# Altium PCB imprimir.PcbDoc (part 3 of 4)
Units mm, origin at the board's own origin, x right, y up, seen from the top; angles counter-clockwise.
Board outline 196.72 x 221.49 mm, 2 copper layers (Top Layer, Bottom Layer); 172 components, 0 nets, 904 pads, 232 vias.
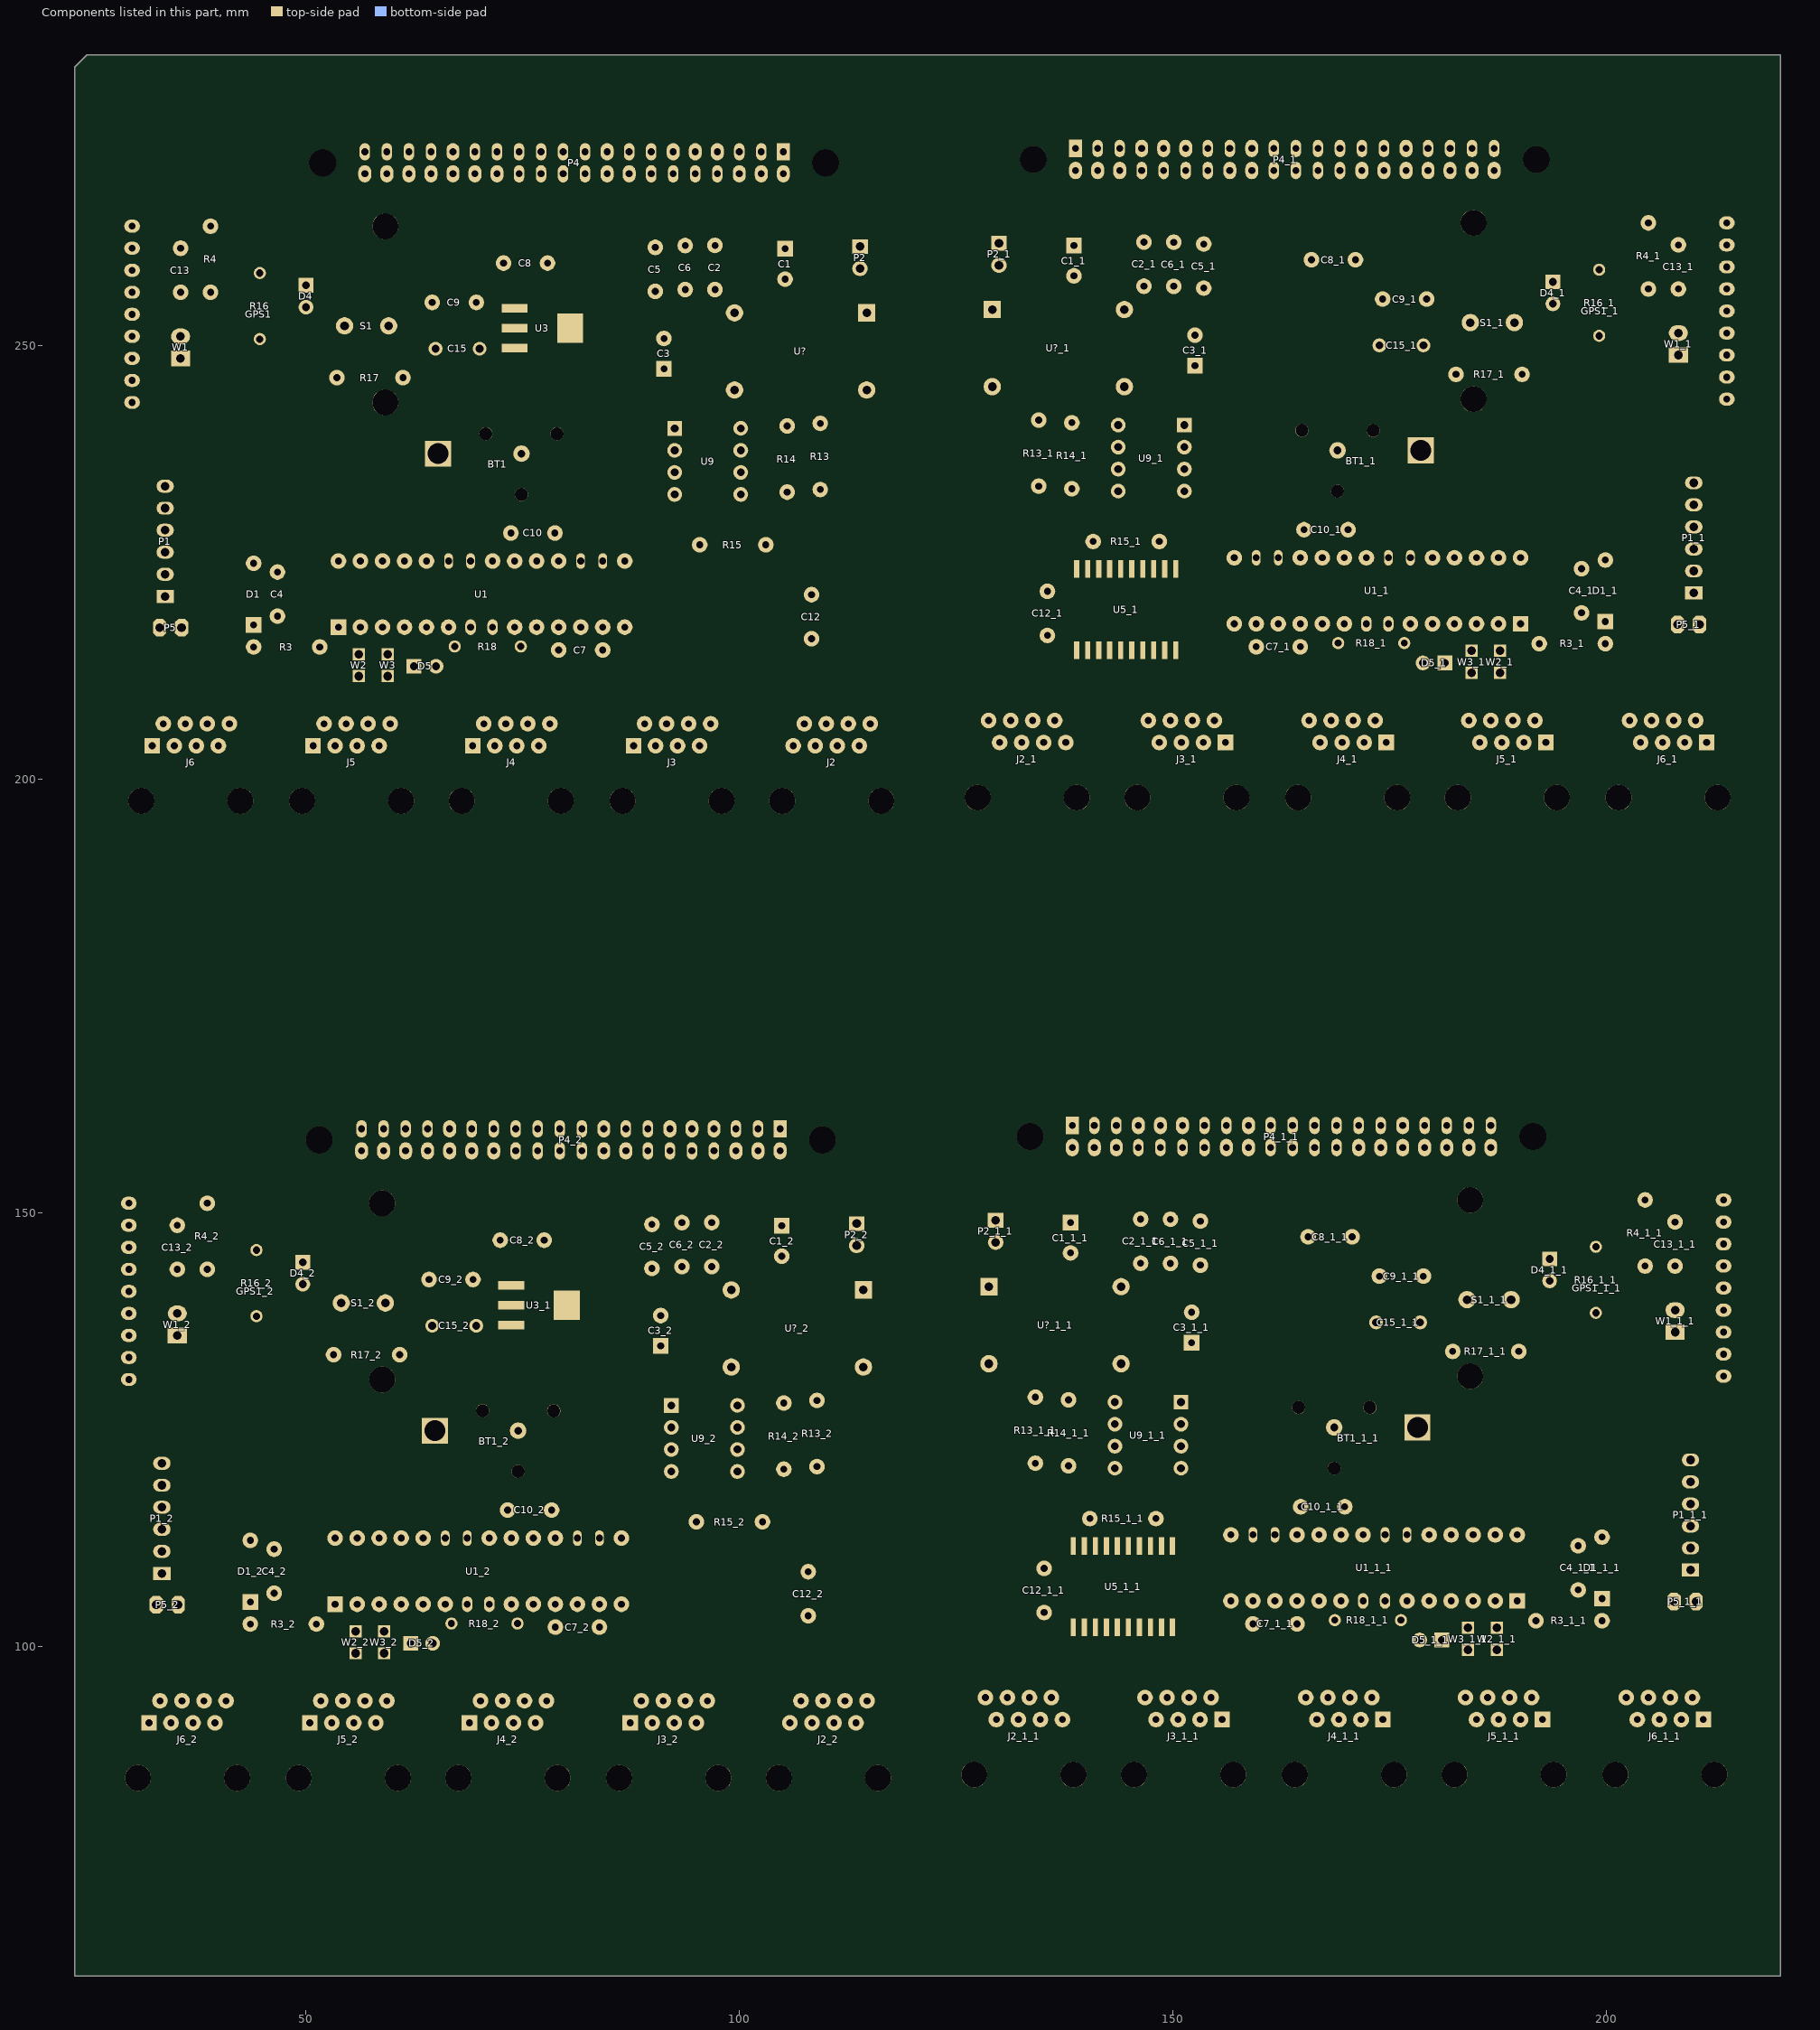
[diagram p3: the components of this part, seen from the top]

## Via types
v1: diameter 1.6, hole 0.6, Top Layer to Bottom Layer, 232 vias

## Nets (pads, with @x,y where several pads share a name; then routed paths per layer and width w, separated by ;. In a path a pad name is that pad's centre, name@x,y a point inside that pad or via, vN(x,y) a via of type N, cw(c..) or ccw(c..) an arc to the next point about the centre after c; other vN are vias at no path point) (continued)
copper on no net: (continued)
  Top Layer w0.025: 96.368,108.585 98.095,108.585 ; 96.368,108.61 96.571,108.61 ; 96.368,108.636 98.019,108.636 ; 96.368,108.661 97.993,108.661 ; 96.368,108.687 97.968,108.687 ; 96.368,108.712 97.942,108.712 ; 96.368,108.737 97.942,108.737 ; 96.368,108.763 97.917,108.763 ; 96.368,108.788 97.917,108.788 ; 96.368,108.814 97.917,108.814 ; 96.368,108.839 97.917,108.839 ; 96.368,108.864 97.917,108.864 ; 96.368,108.89 97.917,108.89 ; 96.368,108.915 97.942,108.915 ; 96.393,106.147 96.418,106.147 ; 96.393,106.172 96.418,106.172 ; 96.393,108.356 96.418,108.356 ; 96.393,108.382 96.418,108.382 ; 96.393,108.407 96.52,108.407 ; 96.393,108.941 97.942,108.941 ; 96.393,108.966 97.942,108.966 ; 96.393,108.991 97.968,108.991 ; 96.393,109.017 97.993,109.017 ; 96.393,109.042 98.019,109.042 ; 96.418,109.068 98.044,109.068 ; 96.418,109.093 98.095,109.093 ; 96.418,109.118 98.146,109.118 ; 96.418,109.144 98.222,109.144 ; 96.444,106.629 96.52,106.629 ; 96.444,106.655 97.841,106.655 ; 96.444,106.68 97.841,106.68 ; 96.444,106.705 96.672,106.705 ; 96.444,106.731 96.672,106.731 ; 96.444,109.169 98.374,109.169 ; 96.444,109.195 100.533,109.195 ; 96.444,109.22 100.533,109.22 ; 96.469,106.604 96.495,106.604 ; 96.469,109.245 100.508,109.245 ; 96.469,109.271 100.508,109.271 ; 96.495,105.969 96.52,105.969 ; 96.495,109.296 100.482,109.296 ; 96.495,109.322 100.482,109.322 ; 96.495,109.347 100.457,109.347 ; 96.52,105.943 100.559,105.943 ; 96.52,106.223 100.686,106.223 ; 96.52,106.248 100.711,106.248 ; 96.52,106.274 98.323,106.274 ; 96.52,106.299 98.222,106.299 ; 96.52,106.324 98.146,106.324 ; 96.52,106.35 98.095,106.35 ; 96.52,106.375 98.069,106.375 ; 96.52,106.401 96.698,106.401 ; 96.52,109.372 100.457,109.372 ; 96.52,109.398 100.432,109.398 ; 96.545,105.918 100.533,105.918 ; 96.545,106.147 100.66,106.147 ; 96.545,106.172 100.66,106.172 ; 96.545,106.197 100.686,106.197 ; 96.545,106.426 96.698,106.426 ; 96.545,109.423 100.432,109.423 ; 96.571,105.867 100.508,105.867 ; 96.571,105.893 100.533,105.893 ; 96.571,105.969 100.584,105.969 ; 96.571,105.994 100.584,105.994 ; 96.571,106.02 100.609,106.02 ; 96.571,106.045 100.609,106.045 ; 96.571,106.07 100.635,106.07 ; 96.571,106.096 100.635,106.096 ; 96.571,106.121 100.635,106.121 ; 96.571,106.451 96.698,106.451 ; 96.571,106.477 96.698,106.477 ; 96.571,106.502 96.698,106.502 ; 96.571,106.528 96.698,106.528 ; 96.571,106.553 96.698,106.553 ; 96.571,106.578 97.892,106.578 ; 96.571,106.604 97.866,106.604 ; 96.571,106.629 97.866,106.629 ; 96.571,108.306 99.111,108.306 ; 96.571,108.331 98.984,108.331 ; 96.571,108.356 96.825,108.356 ; 96.571,108.382 96.825,108.382 ; 96.571,109.449 100.406,109.449 ; 96.571,109.474 100.406,109.474 ; 96.596,105.816 100.482,105.816 ; 96.596,105.842 100.482,105.842 ; 96.596,108.255 96.952,108.255 ; 96.596,108.28 96.952,108.28 ; 96.596,108.407 96.825,108.407 ; 96.596,108.433 96.825,108.433 ; 96.596,108.458 96.825,108.458 ; 96.596,108.61 98.044,108.61 ; 96.596,109.499 100.381,109.499 ; 96.596,109.525 100.355,109.525 ; 96.622,105.791 100.457,105.791 ; 96.622,108.052 96.825,108.052 ; 96.622,108.077 96.825,108.077 ; 96.622,108.204 96.926,108.204 ; 96.622,108.229 96.926,108.229 ; 96.622,109.55 100.33,109.55 ; 96.647,105.766 100.432,105.766 ; 96.647,107.848 96.749,107.848 ; 96.647,107.874 96.774,107.874 ; 96.647,107.899 96.799,107.899 ; 96.647,107.925 96.825,107.925 ; 96.647,107.95 96.952,107.95 ; 96.647,107.975 96.952,107.975 ; 96.647,108.001 96.952,108.001 ; 96.647,108.026 96.952,108.026 ; 96.647,108.102 96.825,108.102 ; 96.647,108.128 96.825,108.128 ; 96.647,108.153 96.825,108.153 ; 96.647,108.179 96.876,108.179 ; 96.647,109.576 100.33,109.576 ; 96.647,109.601 100.305,109.601 ; 96.672,105.74 100.406,105.74 ; 96.672,107.798 96.723,107.798 ; 96.672,107.823 96.723,107.823 ; 96.672,109.626 100.305,109.626 ; 96.672,219.1 96.774,219.1 ; 96.672,219.126 96.749,219.126 ; 96.672,219.151 96.749,219.151 ; 96.672,219.177 96.749,219.177 ; 96.698,105.715 100.381,105.715 ; 96.698,109.652 100.279,109.652 ; 96.698,219.024 96.774,219.024 ; 96.698,219.05 96.774,219.05 ; 96.698,219.075 96.774,219.075 ; 96.723,105.689 100.381,105.689 ; 96.723,106.401 98.019,106.401 ; 96.723,106.426 97.993,106.426 ; 96.723,106.528 97.917,106.528 ; 96.723,106.553 97.892,106.553 ; 96.723,109.677 100.254,109.677 ; 96.723,218.948 96.774,218.948 ; 96.723,218.973 96.774,218.973 ; 96.723,218.999 96.774,218.999 ; 96.749,105.664 100.355,105.664 ; 96.749,106.451 97.968,106.451 ; 96.749,106.477 97.942,106.477 ; 96.749,106.502 97.942,106.502 ; 96.749,106.705 97.841,106.705 ; 96.749,109.703 100.228,109.703 ; 96.749,109.728 100.203,109.728 ; 96.749,218.846 96.799,218.846 ; 96.749,218.872 96.799,218.872 ; 96.749,218.897 96.799,218.897 ; 96.749,218.923 96.774,218.923 ; 96.749,221.082 96.952,221.082 ; 96.749,221.107 96.952,221.107 ; 96.749,221.132 97.206,221.132 ; 96.749,221.158 97.206,221.158 ; 96.749,221.183 98.603,221.183 ; 96.749,221.209 98.552,221.209 ; 96.749,221.234 98.476,221.234 ; 96.749,221.259 96.952,221.259 ; 96.749,221.285 98.4,221.285 ; 96.749,221.31 98.374,221.31 ; 96.749,221.336 98.349,221.336 ; 96.749,221.361 98.323,221.361 ; 96.749,221.386 98.323,221.386 ; 96.749,221.412 98.298,221.412 ; 96.749,221.437 98.298,221.437 ; 96.749,221.463 98.298,221.463 ; 96.749,221.488 98.298,221.488 ; 96.749,221.513 98.298,221.513 ; 96.749,221.539 98.298,221.539 ; 96.749,221.564 98.323,221.564 ; 96.774,105.639 100.305,105.639 ; 96.774,109.753 100.178,109.753 ; 96.774,218.796 96.799,218.796 ; 96.774,218.821 96.799,218.821 ; 96.774,221.005 96.799,221.005 ; 96.774,221.031 96.799,221.031 ; 96.774,221.056 96.901,221.056 ; 96.774,221.59 98.323,221.59 ; 96.774,221.615 98.323,221.615 ; 96.774,221.64 98.349,221.64 ; 96.774,221.666 98.374,221.666 ; 96.774,221.691 98.4,221.691 ; 96.799,105.613 100.305,105.613 ; 96.799,221.717 98.425,221.717 ; 96.799,221.742 98.476,221.742 ; 96.799,221.767 98.527,221.767 ; 96.799,221.793 98.603,221.793 ; 96.825,105.588 100.279,105.588 ; 96.825,109.779 100.152,109.779 ; 96.825,109.804 100.127,109.804 ; 96.825,219.278 96.901,219.278 ; 96.825,219.304 98.222,219.304 ; 96.825,219.329 98.222,219.329 ; 96.825,219.354 97.053,219.354 ; 96.825,219.38 97.053,219.38 ; 96.825,221.818 98.755,221.818 ; 96.825,221.844 100.914,221.844 ; 96.825,221.869 100.914,221.869 ; 96.85,105.562 100.254,105.562 ; 96.85,108.052 96.952,108.052 ; 96.85,108.356 98.882,108.356 ; 96.85,108.382 97.714,108.382 ; 96.85,108.407 97.714,108.407 ; 96.85,108.433 97.714,108.433 ; 96.85,108.458 97.688,108.458 ; 96.85,108.483 97.688,108.483 ; 96.85,108.509 97.714,108.509 ; 96.85,219.253 96.876,219.253 ; 96.85,221.894 100.889,221.894 ; 96.85,221.92 100.889,221.92 ; 96.876,108.077 96.926,108.077 ; 96.876,109.83 100.101,109.83 ; 96.876,218.618 96.901,218.618 ; 96.876,221.945 100.863,221.945 ; 96.876,221.971 100.863,221.971 ; 96.876,221.996 100.838,221.996 ; 96.901,105.537 100.203,105.537 ; 96.901,109.855 100.076,109.855 ; 96.901,218.592 100.94,218.592 ; 96.901,218.872 101.067,218.872 ; 96.901,218.897 101.092,218.897 ; 96.901,218.923 98.704,218.923 ; 96.901,218.948 98.603,218.948 ; 96.901,218.973 98.527,218.973 ; 96.901,218.999 98.476,218.999 ; 96.901,219.024 98.45,219.024 ; 96.901,219.05 97.079,219.05 ; 96.901,222.021 100.838,222.021 ; 96.901,222.047 100.813,222.047 ; 96.926,105.512 100.178,105.512 ; 96.926,109.88 100.051,109.88 ; 96.926,218.567 100.914,218.567 ; 96.926,218.796 101.041,218.796 ; 96.926,218.821 101.041,218.821 ; 96.926,218.846 101.067,218.846 ; 96.926,219.075 97.079,219.075 ; 96.926,222.072 100.813,222.072 ; 96.952,106.731 97.841,106.731 ; 96.952,109.906 100,109.906 ; 96.952,218.516 100.889,218.516 ; 96.952,218.542 100.914,218.542 ; 96.952,218.618 100.965,218.618 ; 96.952,218.643 100.965,218.643 ; 96.952,218.669 100.99,218.669 ; 96.952,218.694 100.99,218.694 ; 96.952,218.719 101.016,218.719 ; 96.952,218.745 101.016,218.745 ; 96.952,218.77 101.016,218.77 ; 96.952,219.1 97.079,219.1 ; 96.952,219.126 97.079,219.126 ; 96.952,219.151 97.079,219.151 ; 96.952,219.177 97.079,219.177 ; 96.952,219.202 97.079,219.202 ; 96.952,219.227 98.273,219.227 ; 96.952,219.253 98.247,219.253 ; 96.952,219.278 98.247,219.278 ; 96.952,220.955 99.492,220.955 ; 96.952,220.98 99.365,220.98 ; 96.952,221.005 97.206,221.005 ; 96.952,221.031 97.206,221.031 ; 96.952,222.098 100.787,222.098 ; 96.952,222.123 100.787,222.123 ; 96.977,105.486 100.152,105.486 ; 96.977,108.204 97.714,108.204 ; 96.977,108.229 99.39,108.229 ; 96.977,108.255 99.289,108.255 ; 96.977,108.28 99.187,108.28 ; 96.977,218.465 100.863,218.465 ; 96.977,218.491 100.863,218.491 ; 96.977,220.904 97.333,220.904 ; 96.977,220.929 97.333,220.929 ; 96.977,221.056 97.206,221.056 ; 96.977,221.082 97.206,221.082 ; 96.977,221.107 97.206,221.107 ; 96.977,221.259 98.425,221.259 ; 96.977,222.148 100.762,222.148 ; 96.977,222.174 100.736,222.174 ; 97.003,105.461 100.101,105.461 ; 97.003,108.128 97.714,108.128 ; 97.003,108.153 97.714,108.153 ; 97.003,108.179 97.714,108.179 ; 97.003,109.931 99.974,109.931 ; 97.003,218.44 100.838,218.44 ; 97.003,220.701 97.206,220.701 ; 97.003,220.726 97.206,220.726 ; 97.003,220.853 97.307,220.853 ; 97.003,220.878 97.307,220.878 ; 97.003,222.199 100.711,222.199 ; 97.028,108.052 97.688,108.052 ; 97.028,108.077 97.688,108.077 ; 97.028,108.102 97.714,108.102 ; 97.028,109.957 99.949,109.957 ; 97.028,218.415 100.813,218.415 ; 97.028,220.497 97.13,220.497 ; 97.028,220.523 97.155,220.523 ; 97.028,220.548 97.18,220.548 ; 97.028,220.574 97.206,220.574 ; 97.028,220.599 97.333,220.599 ; 97.028,220.624 97.333,220.624 ; 97.028,220.65 97.333,220.65 ; 97.028,220.675 97.333,220.675 ; 97.028,220.751 97.206,220.751 ; 97.028,220.777 97.206,220.777 ; 97.028,220.802 97.206,220.802 ; 97.028,220.828 97.257,220.828 ; 97.028,222.225 100.711,222.225 ; 97.028,222.25 100.686,222.25 ; 97.053,105.435 100.076,105.435 ; 97.053,108.026 97.714,108.026 ; 97.053,218.389 100.787,218.389 ; 97.053,220.447 97.104,220.447 ; 97.053,220.472 97.104,220.472 ; 97.053,222.275 100.686,222.275 ; 97.079,105.41 100.025,105.41 ; 97.079,108.001 97.663,108.001 ; 97.079,109.982 99.898,109.982 ; 97.079,218.364 100.762,218.364 ; 97.079,222.301 100.66,222.301 ; 97.104,107.975 97.155,107.975 ; 97.104,110.007 99.873,110.007 ; 97.104,218.338 100.762,218.338 ; 97.104,219.05 98.4,219.05 ; 97.104,219.075 98.374,219.075 ; 97.104,219.177 98.298,219.177 ; 97.104,219.202 98.273,219.202 ; 97.104,222.326 100.635,222.326 ; 97.13,105.385 99.974,105.385 ; 97.13,218.313 100.736,218.313 ; 97.13,219.1 98.349,219.1 ; 97.13,219.126 98.323,219.126 ; 97.13,219.151 98.323,219.151 ; 97.13,219.354 98.222,219.354 ; 97.13,222.352 100.609,222.352 ; 97.13,222.377 100.584,222.377 ; 97.155,218.288 100.686,218.288 ; 97.155,222.402 100.559,222.402 ; 97.18,105.359 99.924,105.359 ; 97.18,107.975 97.257,107.975 ; 97.18,110.033 99.822,110.033 ; 97.18,218.262 100.686,218.262 ; 97.206,107.95 97.231,107.95 ; 97.206,110.058 99.771,110.058 ; 97.206,218.237 100.66,218.237 ; 97.206,222.428 100.533,222.428 ; 97.206,222.453 100.508,222.453 ; 97.231,105.334 99.873,105.334 ; 97.231,218.211 100.635,218.211 ; 97.231,220.701 97.333,220.701 ; 97.231,221.005 99.263,221.005 ; 97.231,221.031 98.095,221.031 ; 97.231,221.056 98.095,221.056 ; 97.231,221.082 98.095,221.082 ; 97.231,221.107 98.069,221.107 ; 97.231,221.132 98.069,221.132 ; 97.231,221.158 98.095,221.158 ; 97.257,220.726 97.307,220.726 ; 97.257,222.479 100.482,222.479 ; 97.282,105.308 99.822,105.308 ; 97.282,110.084 99.72,110.084 ; 97.282,218.186 100.584,218.186 ; 97.282,222.504 100.457,222.504 ; 97.307,107.95 97.638,107.95 ; 97.307,107.975 97.638,107.975 ; 97.307,218.161 100.559,218.161 ; 97.307,222.529 100.432,222.529 ; 97.333,105.283 99.771,105.283 ; 97.333,107.798 97.485,107.798 ; 97.333,107.823 97.638,107.823 ; 97.333,107.899 97.638,107.899 ; 97.333,107.925 97.638,107.925 ; 97.333,110.109 99.644,110.109 ; 97.333,219.38 98.222,219.38 ; 97.333,222.555 100.381,222.555 ; 97.358,107.848 97.638,107.848 ; 97.358,107.874 97.638,107.874 ; 97.358,218.135 100.533,218.135 ; 97.358,220.853 98.095,220.853 ; 97.358,220.878 99.771,220.878 ; 97.358,220.904 99.67,220.904 ; 97.358,220.929 99.568,220.929 ; 97.384,110.134 99.568,110.134 ; 97.384,218.11 100.482,218.11 ; 97.384,220.777 98.095,220.777 ; 97.384,220.802 98.095,220.802 ; 97.384,220.828 98.095,220.828 ; 97.384,222.58 100.355,222.58 ; 97.409,105.258 99.695,105.258 ; 97.409,220.701 98.069,220.701 ; 97.409,220.726 98.069,220.726 ; 97.409,220.751 98.095,220.751 ; 97.409,222.606 100.33,222.606 ; 97.434,218.084 100.457,218.084 ; 97.434,220.675 98.095,220.675 ; 97.46,110.16 99.517,110.16 ; 97.46,218.059 100.406,218.059 ; 97.46,220.65 98.044,220.65 ; 97.46,222.631 100.279,222.631 ; 97.485,105.232 99.644,105.232 ; 97.485,220.624 97.536,220.624 ; 97.485,222.656 100.254,222.656 ; 97.511,107.798 97.663,107.798 ; 97.511,218.034 100.355,218.034 ; 97.536,107.721 97.663,107.721 ; 97.536,107.747 97.663,107.747 ; 97.536,107.772 97.663,107.772 ; 97.536,110.185 99.416,110.185 ; 97.561,105.207 99.543,105.207 ; 97.561,107.671 97.638,107.671 ; 97.561,107.696 97.663,107.696 ; 97.561,218.008 100.305,218.008 ; 97.561,220.624 97.638,220.624 ; 97.561,222.682 100.203,222.682 ; 97.587,220.599 97.612,220.599 ; 97.587,222.707 100.152,222.707 ; 97.612,110.211 99.339,110.211 ; 97.612,217.983 100.254,217.983 ; 97.638,105.181 99.466,105.181 ; 97.663,217.957 100.203,217.957 ; 97.663,222.733 100.101,222.733 ; 97.688,220.599 98.019,220.599 ; 97.688,220.624 98.019,220.624 ; 97.714,217.932 100.152,217.932 ; 97.714,220.447 97.866,220.447 ; 97.714,220.472 98.019,220.472 ; 97.714,220.548 98.019,220.548 ; 97.714,220.574 98.019,220.574 ; 97.714,222.758 100.025,222.758 ; 97.739,108.026 97.968,108.026 ; 97.739,108.052 99.873,108.052 ; 97.739,108.077 99.822,108.077 ; 97.739,108.102 99.771,108.102 ; 97.739,108.128 99.72,108.128 ; 97.739,108.153 99.619,108.153 ; 97.739,108.179 99.568,108.179 ; 97.739,108.204 99.466,108.204 ; 97.739,108.382 98.781,108.382 ; 97.739,108.407 98.679,108.407 ; 97.739,108.509 98.298,108.509 ; 97.739,110.236 99.212,110.236 ; 97.739,220.497 98.019,220.497 ; 97.739,220.523 98.019,220.523 ; 97.765,105.156 99.365,105.156 ; 97.765,107.874 97.866,107.874 ; 97.765,107.899 97.892,107.899 ; 97.765,107.925 97.892,107.925 ; 97.765,107.95 97.942,107.95 ; 97.765,107.975 97.942,107.975 ; 97.765,108.001 97.968,108.001 ; 97.765,108.433 98.577,108.433 ; 97.765,108.458 98.476,108.458 ; 97.765,108.483 98.374,108.483 ; 97.765,222.783 99.949,222.783 ; 97.79,107.798 97.841,107.798 ; 97.79,107.823 97.866,107.823 ; 97.79,107.848 97.866,107.848 ; 97.79,217.907 100.076,217.907 ; 97.841,105.131 99.263,105.131 ; 97.841,222.809 99.898,222.809 ; 97.866,217.881 100.025,217.881 ; 97.892,220.447 98.044,220.447 ; 97.917,220.37 98.044,220.37 ; 97.917,220.396 98.044,220.396 ; 97.917,220.421 98.044,220.421 ; 97.917,222.834 99.797,222.834 ; 97.942,217.856 99.924,217.856 ; 97.942,220.32 98.019,220.32 ; 97.942,220.345 98.044,220.345 ; 97.968,107.188 98.095,107.188 ; 97.968,107.213 98.095,107.213 ; 97.993,107.239 98.069,107.239 ; 97.993,108.001 98.425,108.001 ; 97.993,108.026 99.924,108.026 ; 97.993,222.86 99.72,222.86 ; 98.019,107.163 98.273,107.163 ; 98.019,107.264 98.069,107.264 ; 98.019,107.975 98.4,107.975 ; 98.019,217.83 99.847,217.83 ; 98.044,107.925 100.127,107.925 ; 98.044,107.95 98.4,107.95 ; 98.069,107.798 98.323,107.798 ; 98.069,107.823 98.349,107.823 ; 98.069,107.848 98.374,107.848 ; 98.069,107.874 98.374,107.874 ; 98.069,107.899 100.152,107.899 ; 98.095,107.671 98.196,107.671 ; 98.095,107.696 98.196,107.696 ; 98.095,107.721 98.222,107.721 ; 98.095,107.747 98.222,107.747 ; 98.095,107.772 98.298,107.772 ; 98.12,107.137 98.273,107.137 ; 98.12,107.62 98.171,107.62 ; 98.12,107.645 98.171,107.645 ; 98.12,220.675 98.349,220.675 ; 98.12,220.701 100.254,220.701 ; 98.12,220.726 100.203,220.726 ; 98.12,220.751 100.152,220.751 ; 98.12,220.777 100.101,220.777 ; 98.12,220.802 100,220.802 ; 98.12,220.828 99.949,220.828 ; 98.12,220.853 99.847,220.853 ; 98.12,221.031 99.162,221.031 ; 98.12,221.056 99.06,221.056 ; 98.12,221.158 98.679,221.158 ; 98.12,222.885 99.593,222.885 ; 98.146,107.188 98.273,107.188 ; 98.146,107.213 98.273,107.213 ; 98.146,217.805 99.746,217.805 ; 98.146,220.523 98.247,220.523 ; 98.146,220.548 98.273,220.548 ; 98.146,220.574 98.273,220.574 ; 98.146,220.599 98.323,220.599 ; 98.146,220.624 98.323,220.624 ; 98.146,220.65 98.349,220.65 ; 98.146,221.082 98.958,221.082 ; 98.146,221.107 98.857,221.107 ; 98.146,221.132 98.755,221.132 ; 98.171,107.239 98.273,107.239 ; 98.171,220.447 98.222,220.447 ; 98.171,220.472 98.247,220.472 ; 98.171,220.497 98.247,220.497 ; 98.196,107.264 98.247,107.264 ; 98.222,107.112 98.273,107.112 ; 98.222,217.78 99.644,217.78 ; 98.247,107.747 98.273,107.747 ; 98.349,110.134 99.619,110.134 ; 98.349,219.837 98.476,219.837 ; 98.349,219.862 98.476,219.862 ; 98.374,107.798 98.755,107.798 ; 98.374,219.888 98.45,219.888 ; 98.374,220.65 98.806,220.65 ; 98.374,220.675 100.305,220.675 ; 98.4,107.061 100.762,107.061 ; 98.4,107.086 98.755,107.086 ; 98.4,107.772 98.679,107.772 ; 98.4,107.823 98.781,107.823 ; 98.4,107.848 99.289,107.848 ; 98.4,107.874 99.289,107.874 ; 98.4,219.812 98.654,219.812 ; 98.4,219.913 98.45,219.913 ; 98.4,220.624 98.781,220.624 ; 98.425,107.112 98.755,107.112 ; 98.425,107.747 98.501,107.747 ; 98.425,107.95 100.076,107.95 ; 98.425,220.574 100.508,220.574 ; 98.425,220.599 98.781,220.599 ; 98.45,107.137 98.603,107.137 ; 98.45,107.721 98.476,107.721 ; 98.45,107.975 100.025,107.975 ; 98.45,108.001 99.974,108.001 ; 98.45,220.447 98.704,220.447 ; 98.45,220.472 98.73,220.472 ; 98.45,220.497 98.755,220.497 ; 98.45,220.523 98.755,220.523 ; 98.45,220.548 100.533,220.548 ; 98.476,107.163 98.603,107.163 ; 98.476,107.188 98.603,107.188 ; 98.476,107.213 98.603,107.213 ; 98.476,220.32 98.577,220.32 ; 98.476,220.345 98.577,220.345 ; 98.476,220.37 98.603,220.37 ; 98.476,220.396 98.603,220.396 ; 98.476,220.421 98.679,220.421 ; 98.501,107.239 98.603,107.239 ; 98.501,219.786 98.654,219.786 ; 98.501,220.269 98.552,220.269 ; 98.501,220.294 98.552,220.294 ; 98.527,107.036 100.762,107.036 ; 98.527,107.264 98.577,107.264 ; 98.527,107.747 98.679,107.747 ; 98.527,219.837 98.654,219.837 ; 98.527,219.862 98.654,219.862 ; 98.552,107.544 98.654,107.544 ; 98.552,107.569 98.654,107.569 ; 98.552,107.594 98.654,107.594 ; 98.552,107.62 98.654,107.62 ; 98.552,107.645 98.679,107.645 ; 98.552,107.671 98.654,107.671 ; 98.552,107.696 98.654,107.696 ; 98.552,107.721 98.654,107.721 ; 98.552,109.169 100.533,109.169 ; 98.552,110.16 99.39,110.16 ; 98.552,219.888 98.654,219.888 ; 98.577,107.518 98.654,107.518 ; 98.577,219.913 98.628,219.913 ; 98.603,219.761 98.654,219.761 ; 98.628,107.01 100.762,107.01 ; 98.628,107.137 98.755,107.137 ; 98.628,107.163 98.831,107.163 ; 98.628,107.188 98.857,107.188 ; 98.628,220.396 98.654,220.396 ; 98.654,107.213 98.882,107.213 ; 98.654,107.239 98.755,107.239 ; 98.679,107.264 98.73,107.264 ; 98.704,109.144 100.559,109.144 ; 98.73,106.985 100.762,106.985 ; 98.73,222.783 100,222.783 ; 98.755,110.185 99.162,110.185 ; 98.755,220.447 99.136,220.447 ; 98.781,107.086 99.238,107.086 ; 98.781,107.239 99.009,107.239 ; 98.781,219.71 101.143,219.71 ; 98.781,219.735 99.136,219.735 ; 98.781,220.421 99.06,220.421 ; 98.781,220.472 99.162,220.472 ; 98.781,220.497 99.67,220.497 ; 98.781,220.523 99.67,220.523 ; 98.806,106.959 100.762,106.959 ; 98.806,107.264 98.984,107.264 ; 98.806,109.118 100.559,109.118 ; 98.806,219.761 99.136,219.761 ; 98.806,220.396 98.882,220.396 ; 98.806,220.599 100.457,220.599 ; 98.831,107.112 99.238,107.112 ; 98.831,107.29 98.984,107.29 ; 98.831,107.823 99.289,107.823 ; 98.831,109.093 100.559,109.093 ; 98.831,219.786 98.984,219.786 ; 98.831,220.37 98.857,220.37 ; 98.831,220.624 100.406,220.624 ; 98.831,220.65 100.355,220.65 ; 98.857,107.137 99.238,107.137 ; 98.857,107.163 99.06,107.163 ; 98.857,107.798 99.289,107.798 ; 98.857,219.812 98.984,219.812 ; 98.857,219.837 98.984,219.837 ; 98.857,219.862 98.984,219.862 ; 98.882,106.274 100.711,106.274 ; 98.882,107.188 98.908,107.188 ; 98.882,107.315 98.984,107.315 ; 98.882,107.772 99.289,107.772 ; 98.882,109.068 100.584,109.068 ; 98.882,219.888 98.984,219.888 ; 98.908,106.934 100.762,106.934 ; 98.908,107.213 98.984,107.213 ; 98.908,107.34 98.958,107.34 ; 98.908,107.747 98.984,107.747 ; 98.908,109.042 100.584,109.042 ; 98.908,219.685 101.143,219.685 ; 98.908,219.913 98.958,219.913 ; 98.908,220.396 99.06,220.396 ; 98.933,107.188 99.009,107.188 ; 98.933,107.721 98.958,107.721 ; 98.933,220.193 99.035,220.193 ; 98.933,220.218 99.035,220.218 ; 98.933,220.243 99.035,220.243 ; 98.933,220.269 99.035,220.269 ; 98.933,220.294 99.06,220.294 ; 98.933,220.32 99.035,220.32 ; 98.933,220.345 99.035,220.345 ; 98.933,220.37 99.035,220.37 ; 98.933,221.818 100.914,221.818 ; 98.933,222.809 99.771,222.809 ; 98.958,106.299 100.711,106.299 ; 98.958,106.909 100.762,106.909 ; 98.958,108.991 100.584,108.991 ; 98.958,109.017 100.584,109.017 ; 98.958,220.167 99.035,220.167 ; 98.984,108.966 100.609,108.966 ; 99.009,106.883 100.787,106.883 ; 99.009,107.696 99.314,107.696 ; 99.009,107.721 99.314,107.721 ; 99.009,108.941 100.609,108.941 ; 99.009,219.659 101.143,219.659 ; 99.009,219.786 99.136,219.786 ; 99.009,219.812 99.212,219.812 ; 99.009,219.837 99.238,219.837 ; 99.035,106.324 100.711,106.324 ; 99.035,107.671 99.314,107.671 ; 99.035,107.747 99.314,107.747 ; 99.035,108.89 100.609,108.89 ; 99.035,108.915 100.609,108.915 ; 99.035,219.862 99.263,219.862 ; 99.035,219.888 99.136,219.888 ; 99.06,106.35 100.736,106.35 ; 99.06,106.858 100.787,106.858 ; 99.06,107.645 99.136,107.645 ; 99.06,108.814 100.635,108.814 ; 99.06,108.839 100.635,108.839 ; 99.06,108.864 100.635,108.864 ; 99.06,219.913 99.111,219.913 ; 99.085,106.832 100.787,106.832 ; 99.085,108.763 100.635,108.763 ; 99.085,108.788 100.635,108.788 ; 99.085,221.793 100.94,221.793 ; 99.111,106.375 100.736,106.375 ; 99.111,106.807 100.787,106.807 ; 99.111,107.163 99.212,107.163 ; 99.111,107.213 99.212,107.213 ; 99.111,107.239 99.212,107.239 ; 99.111,108.737 100.635,108.737 ; 99.111,219.634 101.143,219.634 ; 99.136,106.401 100.736,106.401 ; 99.136,106.426 100.736,106.426 ; 99.136,106.756 100.787,106.756 ; 99.136,106.782 100.787,106.782 ; 99.136,107.188 99.212,107.188 ; 99.136,107.264 99.187,107.264 ; 99.136,222.834 99.543,222.834 ; 99.162,106.451 100.762,106.451 ; 99.162,106.731 100.787,106.731 ; 99.162,219.735 99.619,219.735 ; 99.162,219.888 99.39,219.888 ; 99.187,106.477 100.762,106.477 ; 99.187,106.502 100.762,106.502 ; 99.187,106.528 100.762,106.528 ; 99.187,106.553 100.762,106.553 ; 99.187,106.578 100.762,106.578 ; 99.187,106.604 100.762,106.604 ; 99.187,106.629 100.762,106.629 ; 99.187,106.655 100.787,106.655 ; 99.187,106.68 100.787,106.68 ; 99.187,106.705 100.787,106.705 ; 99.187,219.608 101.143,219.608 ; 99.187,219.913 99.365,219.913 ; 99.187,221.767 100.94,221.767 ; 99.212,219.761 99.619,219.761 ; 99.212,219.939 99.365,219.939 ; 99.212,220.472 99.67,220.472 ; 99.212,221.742 100.94,221.742 ; 99.238,107.645 99.289,107.645 ; 99.238,219.786 99.619,219.786 ; 99.238,219.812 99.441,219.812 ; 99.238,220.447 99.67,220.447 ; 99.263,107.086 100.736,107.086 ; 99.263,107.112 100.736,107.112 ; 99.263,107.137 99.924,107.137 ; 99.263,107.163 99.517,107.163 ; 99.263,107.188 99.517,107.188 ; 99.263,107.213 99.339,107.213 ; 99.263,107.239 99.339,107.239 ; 99.263,218.923 101.092,218.923 ; 99.263,219.837 99.289,219.837 ; 99.263,219.964 99.365,219.964 ; 99.263,220.421 99.67,220.421 ; 99.263,221.717 100.965,221.717 ; 99.289,107.264 99.339,107.264 ; 99.289,219.583 101.143,219.583 ; 99.289,219.862 99.365,219.862 ; 99.289,219.989 99.339,219.989 ; 99.289,220.396 99.365,220.396 ; 99.289,221.691 100.965,221.691 ; 99.314,219.837 99.39,219.837 ; 99.314,220.37 99.339,220.37 ; 99.339,107.798 100.305,107.798 ; 99.339,107.823 100.279,107.823 ; 99.339,107.848 100.228,107.848 ; 99.339,107.874 100.203,107.874 ; 99.339,218.948 101.092,218.948 ; 99.339,219.558 101.143,219.558 ; 99.339,221.64 100.965,221.64 ; 99.339,221.666 100.965,221.666 ; 99.365,107.239 99.492,107.239 ; 99.365,107.264 99.466,107.264 ; 99.365,107.29 99.466,107.29 ; 99.365,221.615 100.99,221.615 ; 99.39,107.213 99.492,107.213 ; 99.39,107.315 99.441,107.315 ; 99.39,107.772 100.33,107.772 ; 99.39,219.532 101.168,219.532 ; 99.39,220.345 99.695,220.345 ; 99.39,220.37 99.695,220.37 ; 99.39,221.59 100.99,221.59 ; 99.416,107.747 100.127,107.747 ; 99.416,218.973 101.092,218.973 ; 99.416,220.32 99.695,220.32 ; 99.416,220.396 99.695,220.396 ; 99.416,221.539 100.99,221.539 ; 99.416,221.564 100.99,221.564 ; 99.441,107.671 99.822,107.671 ; 99.441,107.696 99.847,107.696 ; 99.441,107.721 99.873,107.721 ; 99.441,218.999 101.117,218.999 ; 99.441,219.507 101.168,219.507 ; 99.441,220.294 99.517,220.294 ; 99.441,221.463 101.016,221.463 ; 99.441,221.488 101.016,221.488 ; 99.441,221.513 101.016,221.513 ; 99.466,107.645 99.619,107.645 ; 99.466,219.481 101.168,219.481 ; 99.466,221.412 101.016,221.412 ; 99.466,221.437 101.016,221.437 ; 99.492,219.024 101.117,219.024 ; 99.492,219.456 101.168,219.456 ; 99.492,219.812 99.593,219.812 ; 99.492,219.862 99.593,219.862 ; 99.492,219.888 99.593,219.888 ; 99.492,221.386 101.016,221.386 ; 99.517,107.62 99.593,107.62 ; 99.517,219.05 101.117,219.05 ; 99.517,219.075 101.117,219.075 ; 99.517,219.405 101.168,219.405 ; 99.517,219.431 101.168,219.431 ; 99.517,219.837 99.593,219.837 ; 99.517,219.913 99.568,219.913 ; 99.543,219.1 101.143,219.1 ; 99.543,219.38 101.168,219.38 ; 99.568,107.163 99.924,107.163 ; 99.568,107.188 99.72,107.188 ; 99.568,107.213 99.695,107.213 ; 99.568,107.239 99.67,107.239 ; 99.568,107.264 99.644,107.264 ; 99.568,219.126 101.143,219.126 ; 99.568,219.151 101.143,219.151 ; 99.568,219.177 101.143,219.177 ; 99.568,219.202 101.143,219.202 ; 99.568,219.227 101.143,219.227 ; 99.568,219.253 101.143,219.253 ; 99.568,219.278 101.143,219.278 ; 99.568,219.304 101.168,219.304 ; 99.568,219.329 101.168,219.329 ; 99.568,219.354 101.168,219.354 ; 99.619,220.294 99.67,220.294 ; 99.644,107.645 99.72,107.645 ; 99.644,219.735 101.117,219.735 ; 99.644,219.761 101.117,219.761 ; 99.644,219.786 100.305,219.786 ; 99.644,219.812 99.898,219.812 ; 99.644,219.837 99.898,219.837 ; 99.644,219.862 99.72,219.862 ; 99.644,219.888 99.72,219.888 ; 99.67,107.62 99.72,107.62 ; 99.67,219.913 99.72,219.913 ; 99.72,220.447 100.686,220.447 ; 99.72,220.472 100.66,220.472 ; 99.72,220.497 100.609,220.497 ; 99.72,220.523 100.584,220.523 ; 99.746,107.188 99.949,107.188 ; 99.746,219.888 99.873,219.888 ; 99.746,219.913 99.847,219.913 ; 99.746,219.939 99.847,219.939 ; 99.771,107.213 99.924,107.213 ; 99.771,219.862 99.873,219.862 ; 99.771,219.964 99.822,219.964 ; 99.771,220.421 100.711,220.421 ; 99.797,220.396 100.508,220.396 ; 99.822,220.32 100.203,220.32 ; 99.822,220.345 100.228,220.345 ; 99.822,220.37 100.254,220.37 ; 99.847,220.294 100,220.294 ; 99.898,107.671 100.076,107.671 ; 99.898,107.696 100.076,107.696 ; 99.898,107.721 100.076,107.721 ; 99.898,220.269 99.974,220.269 ; 99.924,107.645 100.051,107.645 ; 99.949,107.137 100.736,107.137 ; 99.949,107.62 100.025,107.62 ; 99.949,219.812 100.305,219.812 ; 99.949,219.837 100.101,219.837 ; 99.949,219.862 100.076,219.862 ; 99.949,219.888 100.051,219.888 ; 99.949,219.913 100.025,219.913 ; 99.974,107.163 100.711,107.163 ; 99.974,107.594 100,107.594 ; 100,107.188 100.152,107.188 ; 100,107.213 100.127,107.213 ; 100.025,107.239 100.101,107.239 ; 100.025,220.294 100.101,220.294 ; 100.051,220.269 100.101,220.269 ; 100.127,219.837 100.33,219.837 ; 100.152,107.671 100.279,107.671 ; 100.152,107.696 100.279,107.696 ; 100.152,219.862 100.305,219.862 ; 100.178,107.721 100.279,107.721 ; 100.178,107.747 100.279,107.747 ; 100.203,107.645 100.254,107.645 ; 100.228,107.188 100.711,107.188 ; 100.254,107.213 100.711,107.213 ; 100.279,220.32 100.457,220.32 ; 100.279,220.345 100.457,220.345 ; 100.279,220.37 100.457,220.37 ; 100.305,107.239 100.355,107.239 ; 100.305,107.747 100.33,107.747 ; 100.305,220.294 100.432,220.294 ; 100.33,219.786 101.117,219.786 ; 100.33,220.269 100.406,220.269 ; 100.355,219.812 101.092,219.812 ; 100.355,220.243 100.381,220.243 ; 100.381,219.837 100.533,219.837 ; 100.381,219.862 100.508,219.862 ; 100.406,107.239 100.686,107.239 ; 100.406,219.888 100.482,219.888 ; 100.432,107.264 100.686,107.264 ; 100.457,107.29 100.686,107.29 ; 100.508,107.315 100.66,107.315 ; 100.533,107.34 100.66,107.34 ; 100.533,220.32 100.66,220.32 ; 100.533,220.345 100.66,220.345 ; 100.559,220.37 100.66,220.37 ; 100.559,220.396 100.66,220.396 ; 100.584,220.294 100.635,220.294 ; 100.609,219.837 101.092,219.837 ; 100.635,219.862 101.092,219.862 ; 100.686,219.888 100.736,219.888 ; 100.686,220.396 100.711,220.396 ; 100.736,105.207 102.337,105.207 ; 100.736,105.232 102.337,105.232 ; 100.762,105.258 102.337,105.258 ; 100.762,105.283 102.362,105.283 ; 100.762,105.308 102.362,105.308 ; 100.762,105.334 102.362,105.334 ; 100.787,105.359 102.362,105.359 ; 100.787,105.385 102.387,105.385 ; 100.787,219.888 101.067,219.888 ; 100.813,105.41 102.387,105.41 ; 100.813,105.435 102.387,105.435 ; 100.813,105.461 102.413,105.461 ; 100.813,219.913 101.067,219.913 ; 100.838,105.486 102.413,105.486 ; 100.838,105.512 102.413,105.512 ; 100.838,105.537 102.413,105.537 ; 100.838,219.939 101.067,219.939 ; 100.863,105.562 102.438,105.562 ; 100.863,105.588 102.438,105.588 ; 100.889,105.613 102.438,105.613 ; 100.889,105.639 102.464,105.639 ; 100.889,105.664 102.464,105.664 ; 100.889,219.964 101.041,219.964 ; 100.914,105.689 102.464,105.689 ; 100.914,105.715 102.464,105.715 ; 100.914,105.74 102.489,105.74 ; 100.914,219.989 101.041,219.989 ; 100.94,105.766 102.489,105.766 ; 100.94,105.791 102.489,105.791 ; 100.94,105.816 102.489,105.816 ; 100.965,105.842 102.514,105.842 ; 100.965,105.867 105.715,105.867 ; 100.99,105.893 105.689,105.893 ; 100.99,105.918 105.689,105.918 ; 100.99,105.943 105.689,105.943 ; 100.99,105.969 105.689,105.969 ; 101.016,105.994 105.664,105.994 ; 101.016,106.02 105.664,106.02 ; 101.041,106.045 105.639,106.045 ; 101.041,106.07 105.639,106.07 ; 101.041,106.096 105.639,106.096 ; 101.067,106.147 105.613,106.147 ; 101.067,106.172 105.613,106.172 ; 101.092,106.197 105.588,106.197 ; 101.092,106.223 105.588,106.223 ; 101.117,106.248 105.562,106.248 ; 101.117,106.274 105.562,106.274 ; 101.117,106.299 105.562,106.299 ; 101.117,106.324 105.537,106.324 ; 101.117,217.856 102.718,217.856 ; 101.117,217.881 102.718,217.881 ; 101.143,106.35 105.537,106.35 ; 101.143,106.375 105.537,106.375 ; 101.143,217.907 102.718,217.907 ; 101.143,217.932 102.743,217.932 ; 101.143,217.957 102.743,217.957 ; 101.143,217.983 102.743,217.983 ; 101.168,106.401 105.512,106.401 ; 101.168,106.426 105.512,106.426 ; 101.168,106.451 105.512,106.451 ; 101.168,218.008 102.743,218.008 ; 101.168,218.034 102.768,218.034 ; 101.194,106.477 105.486,106.477 ; 101.194,106.502 105.486,106.502 ; 101.194,106.528 105.461,106.528 ; 101.194,218.059 102.768,218.059 ; 101.194,218.084 102.768,218.084 ; 101.194,218.11 102.794,218.11 ; 101.219,106.553 105.461,106.553 ; 101.219,106.578 105.461,106.578 ; 101.219,106.604 105.461,106.604 ; 101.219,218.135 102.794,218.135 ; 101.219,218.161 102.794,218.161 ; 101.219,218.186 102.794,218.186 ; 101.244,106.629 105.435,106.629 ; 101.244,106.655 105.435,106.655 ; 101.244,218.211 102.819,218.211 ; 101.244,218.237 102.819,218.237 ; 101.27,106.68 105.435,106.68 ; 101.27,106.705 105.41,106.705 ; 101.27,106.731 105.41,106.731 ; 101.27,218.262 102.819,218.262 ; 101.27,218.288 102.845,218.288 ; 101.27,218.313 102.845,218.313 ; 101.295,106.756 105.385,106.756 ; 101.295,106.782 105.385,106.782 ; 101.295,106.807 105.385,106.807 ; 101.295,218.338 102.845,218.338 ; 101.295,218.364 102.845,218.364 ; 101.295,218.389 102.87,218.389 ; 101.321,106.832 105.359,106.832 ; 101.321,106.858 105.359,106.858 ; 101.321,106.883 105.359,106.883 ; 101.321,218.415 102.87,218.415 ; 101.321,218.44 102.87,218.44 ; 101.321,218.465 102.87,218.465 ; 101.346,106.909 105.334,106.909 ; 101.346,106.934 105.334,106.934 ; 101.346,106.959 105.308,106.959 ; 101.346,218.491 102.895,218.491 ; 101.346,218.516 106.096,218.516 ; 101.371,106.985 105.308,106.985 ; 101.371,107.01 105.308,107.01 ; 101.371,107.036 105.308,107.036 ; 101.371,218.542 106.07,218.542 ; 101.371,218.567 106.07,218.567 ; 101.371,218.592 106.07,218.592 ; 101.371,218.618 106.07,218.618 ; 101.397,107.061 105.283,107.061 ; 101.397,107.086 105.283,107.086 ; 101.397,218.643 106.045,218.643 ; 101.397,218.669 106.045,218.669 ; 101.422,107.112 105.258,107.112 ; 101.422,107.137 105.258,107.137 ; 101.422,107.163 105.258,107.163 ; 101.422,218.694 106.02,218.694 ; 101.422,218.719 106.02,218.719 ; 101.422,218.745 106.02,218.745 ; 101.448,107.188 105.232,107.188 ; 101.448,107.213 101.803,107.213 ; 101.448,107.239 101.778,107.239 ; 101.448,218.796 105.994,218.796 ; 101.448,218.821 105.994,218.821 ; 101.473,107.264 101.752,107.264 ; 101.473,107.29 101.752,107.29 ; 101.473,218.846 105.969,218.846 ; 101.473,218.872 105.969,218.872 ; 101.498,107.315 101.549,107.315 ; 101.498,107.34 101.575,107.34 ; 101.498,107.366 101.575,107.366 ; 101.498,218.897 105.943,218.897 ; 101.498,218.923 105.943,218.923 ; 101.498,218.948 105.943,218.948 ; 101.498,218.973 105.918,218.973 ; 101.524,107.391 101.549,107.391 ; 101.524,218.999 105.918,218.999 ; 101.524,219.024 105.918,219.024 ; 101.549,219.05 105.893,219.05 ; 101.549,219.075 105.893,219.075 ; 101.549,219.1 105.893,219.1 ; 101.575,107.594 101.625,107.594 ; 101.575,219.126 105.867,219.126 ; 101.575,219.151 105.867,219.151 ; 101.575,219.177 105.842,219.177 ; 101.6,107.62 101.651,107.62 ; 101.6,107.645 101.651,107.645 ; 101.6,107.671 105.08,107.671 ; 101.6,219.202 105.842,219.202 ; 101.6,219.227 105.842,219.227 ; 101.6,219.253 105.842,219.253 ; 101.625,107.315 101.727,107.315 ; 101.625,107.696 105.054,107.696 ; 101.625,107.721 105.054,107.721 ; 101.625,219.278 105.816,219.278 ; 101.625,219.304 105.816,219.304 ; 101.651,107.34 101.702,107.34 ; 101.651,107.747 105.029,107.747 ; 101.651,107.772 105.029,107.772 ; 101.651,107.798 105.029,107.798 ; 101.651,219.329 105.816,219.329 ; 101.651,219.354 105.791,219.354 ; 101.651,219.38 105.791,219.38 ; 101.676,107.645 105.08,107.645 ; 101.676,107.823 105.004,107.823 ; 101.676,107.848 105.004,107.848 ; 101.676,107.874 105.004,107.874 ; 101.676,219.405 105.766,219.405 ; 101.676,219.431 105.766,219.431 ; 101.676,219.456 105.766,219.456 ; 101.702,107.62 105.08,107.62 ; 101.702,107.899 104.978,107.899 ; 101.702,107.925 104.978,107.925 ; 101.702,107.95 104.953,107.95 ; 101.702,219.481 105.74,219.481 ; 101.702,219.507 105.74,219.507 ; 101.702,219.532 105.74,219.532 ; 101.727,107.594 102.083,107.594 ; 101.727,107.975 104.953,107.975 ; 101.727,108.001 104.953,108.001 ; 101.727,108.026 104.927,108.026 ; 101.727,219.558 105.715,219.558 ; 101.727,219.583 105.715,219.583 ; 101.727,219.608 105.689,219.608 ; 101.752,108.052 104.927,108.052 ; 101.752,108.077 104.927,108.077 ; 101.752,108.102 104.902,108.102 ; 101.752,219.634 105.689,219.634 ; 101.752,219.659 105.689,219.659 ; 101.752,219.685 105.689,219.685 ; 101.778,108.128 104.902,108.128 ; 101.778,108.153 104.902,108.153 ; 101.778,219.71 105.664,219.71 ; 101.778,219.735 105.664,219.735 ; 101.803,107.264 105.207,107.264 ; 101.803,108.179 104.877,108.179 ; 101.803,108.204 104.877,108.204 ; 101.803,108.229 104.851,108.229 ; 101.803,219.761 105.639,219.761 ; 101.803,219.786 105.639,219.786 ; 101.803,219.812 105.639,219.812 ; 101.829,107.213 105.232,107.213 ; 101.829,107.239 105.232,107.239 ; 101.829,107.29 103.454,107.29 ; 101.829,108.255 104.851,108.255 ; 101.829,108.28 104.851,108.28 ; 101.829,108.306 104.851,108.306 ; 101.829,219.837 105.613,219.837 ; 101.829,219.862 102.184,219.862 ; 101.829,219.888 102.159,219.888 ; 101.854,107.569 101.956,107.569 ; 101.854,108.331 104.826,108.331 ; 101.854,108.356 104.826,108.356 ; 101.854,219.913 102.133,219.913 ; 101.854,219.939 102.133,219.939 ; 101.879,107.315 102.133,107.315 ; 101.879,108.382 104.8,108.382 ; 101.879,108.407 104.8,108.407 ; 101.879,108.433 104.8,108.433 ; 101.879,219.964 101.93,219.964 ; 101.879,219.989 101.956,219.989 ; 101.879,220.015 101.956,220.015 ; 101.905,107.34 102.133,107.34 ; 101.905,108.458 104.775,108.458 ; 101.905,108.483 104.775,108.483 ; 101.905,108.509 104.775,108.509 ; 101.905,220.04 101.93,220.04 ; 101.93,107.366 102.057,107.366 ; 101.93,108.534 104.75,108.534 ; 101.93,108.56 104.75,108.56 ; 101.93,108.585 104.75,108.585 ; 101.956,107.391 102.057,107.391 ; 101.956,108.61 104.724,108.61 ; 101.956,108.636 104.724,108.636 ; 101.956,108.661 104.724,108.661 ; 101.956,220.243 102.006,220.243 ; 101.981,107.417 102.032,107.417 ; 101.981,108.687 104.699,108.687 ; 101.981,108.712 104.699,108.712 ; 101.981,220.269 102.032,220.269 ; 101.981,220.294 102.032,220.294 ; 101.981,220.32 105.461,220.32 ; 102.006,108.737 104.699,108.737 ; 102.006,108.763 104.673,108.763 ; 102.006,108.788 104.673,108.788 ; 102.006,219.964 102.108,219.964 ; 102.006,220.345 105.435,220.345 ; 102.006,220.37 105.435,220.37 ; 102.032,108.814 104.648,108.814 ; 102.032,108.839 104.648,108.839 ; 102.032,108.864 104.648,108.864 ; 102.032,219.989 102.083,219.989 ; 102.032,220.396 105.41,220.396 ; 102.032,220.421 105.41,220.421 ; 102.032,220.447 105.41,220.447 ; 102.057,108.89 104.623,108.89 ; 102.057,108.915 104.623,108.915 ; 102.057,220.294 105.461,220.294 ; 102.057,220.472 105.385,220.472 ; 102.057,220.497 105.385,220.497 ; 102.057,220.523 105.385,220.523 ; 102.083,108.941 104.623,108.941 ; 102.083,108.966 104.597,108.966 ; 102.083,108.991 104.597,108.991 ; 102.083,109.017 104.572,109.017 ; 102.083,220.269 105.461,220.269 ; 102.083,220.548 105.359,220.548 ; 102.083,220.574 105.359,220.574 ; 102.083,220.599 105.334,220.599 ; 102.108,107.594 103.403,107.594 ; 102.108,109.042 104.572,109.042 ; 102.108,109.068 104.572,109.068 ; 102.108,109.093 104.546,109.093 ; 102.108,220.243 102.464,220.243 ; 102.108,220.624 105.334,220.624 ; 102.108,220.65 105.334,220.65 ; 102.108,220.675 105.308,220.675 ; 102.133,109.118 104.546,109.118 ; 102.133,109.144 104.546,109.144 ; 102.133,109.169 104.521,109.169 ; 102.133,220.701 105.308,220.701 ; 102.133,220.726 105.308,220.726 ; 102.133,220.751 105.283,220.751 ; 102.159,109.195 104.521,109.195 ; 102.159,109.22 104.521,109.22 ; 102.159,220.777 105.283,220.777 ; 102.159,220.802 105.283,220.802 ; 102.184,107.569 102.641,107.569 ; 102.184,109.245 104.496,109.245 ; 102.184,109.271 104.496,109.271 ; 102.184,109.296 104.496,109.296 ; 102.184,219.913 105.588,219.913 ; 102.184,220.828 105.258,220.828 ; 102.184,220.853 105.258,220.853 ; 102.184,220.878 105.232,220.878 ; 102.21,107.315 102.895,107.315 ; 102.21,109.322 104.47,109.322 ; 102.21,109.347 104.47,109.347 ; 102.21,109.372 104.445,109.372 ; 102.21,219.862 105.613,219.862 ; 102.21,219.888 105.613,219.888 ; 102.21,219.939 103.835,219.939 ; 102.21,220.904 105.232,220.904 ; 102.21,220.929 105.232,220.929 ; 102.21,220.955 105.232,220.955 ; 102.235,109.398 104.445,109.398 ; 102.235,109.423 104.445,109.423 ; 102.235,220.218 102.337,220.218 ; 102.235,220.98 105.207,220.98 ; 102.235,221.005 105.207,221.005 ; 102.26,109.449 104.419,109.449 ; 102.26,109.474 104.419,109.474 ; 102.26,109.499 104.419,109.499 ; 102.26,109.525 104.394,109.525 ; 102.26,219.964 102.514,219.964 ; 102.26,221.031 105.181,221.031 ; 102.26,221.056 105.181,221.056 ; 102.26,221.082 105.181,221.082 ; 102.286,109.55 104.394,109.55 ; 102.286,109.576 104.394,109.576 ; 102.286,219.989 102.514,219.989 ; 102.286,221.107 105.156,221.107 ; 102.286,221.132 105.156,221.132 ; 102.286,221.158 105.156,221.158 ; 102.311,107.34 102.895,107.34 ; 102.311,107.493 102.362,107.493 ; 102.311,107.518 102.387,107.518 ; 102.311,107.544 102.438,107.544 ; 102.311,109.601 104.369,109.601 ; 102.311,109.626 104.369,109.626 ; 102.311,109.652 104.343,109.652 ; 102.311,220.015 102.438,220.015 ; 102.311,221.183 105.131,221.183 ; 102.311,221.209 105.131,221.209 ; 102.311,221.234 105.131,221.234 ; 102.337,109.677 104.343,109.677 ; 102.337,109.703 104.343,109.703 ; 102.337,109.728 104.343,109.728 ; 102.337,220.04 102.438,220.04 ; 102.337,221.259 105.105,221.259 ; 102.337,221.285 105.105,221.285 ; 102.337,221.31 105.105,221.31 ; 102.362,109.753 104.318,109.753 ; 102.362,109.779 104.318,109.779 ; 102.362,220.066 102.413,220.066 ; 102.362,221.336 105.08,221.336 ; 102.362,221.361 105.08,221.361 ; 102.387,107.366 102.54,107.366 ; 102.387,109.804 104.318,109.804 ; 102.387,109.83 104.292,109.83 ; 102.387,109.855 104.292,109.855 ; 102.387,221.386 105.08,221.386 ; 102.387,221.412 105.054,221.412 ; 102.387,221.437 105.054,221.437 ; 102.413,109.88 104.267,109.88 ; 102.413,109.906 104.267,109.906 ; 102.413,109.931 104.267,109.931 ; 102.413,221.463 105.029,221.463 ; 102.413,221.488 105.029,221.488 ; 102.413,221.513 105.029,221.513 ; 102.438,109.957 104.242,109.957 ; 102.438,109.982 104.242,109.982 ; 102.438,221.539 105.004,221.539 ; 102.438,221.564 105.004,221.564 ; 102.464,110.007 104.216,110.007 ; 102.464,110.033 104.216,110.033 ; 102.464,110.058 104.216,110.058 ; 102.464,110.084 104.191,110.084 ; 102.464,221.59 105.004,221.59 ; 102.464,221.615 104.978,221.615 ; 102.464,221.64 104.978,221.64 ; 102.464,221.666 104.953,221.666 ; 102.489,107.391 102.54,107.391 ; 102.489,107.518 102.591,107.518 ; 102.489,107.544 102.616,107.544 ; 102.489,110.109 104.191,110.109 ; 102.489,110.134 104.191,110.134 ; 102.489,110.16 104.191,110.16 ; 102.489,220.243 103.784,220.243 ; 102.489,221.691 104.953,221.691 ; 102.489,221.717 104.953,221.717 ; 102.489,221.742 104.927,221.742 ; 102.514,221.767 104.927,221.767 ; 102.514,221.793 104.927,221.793 ; 102.514,221.818 104.902,221.818 ; 102.54,221.844 104.902,221.844 ; 102.54,221.869 104.902,221.869 ; 102.565,220.218 103.022,220.218 ; 102.565,221.894 104.877,221.894 ; 102.565,221.92 104.877,221.92 ; 102.565,221.945 104.877,221.945 ; 102.591,219.964 103.276,219.964 ; 102.591,221.971 104.851,221.971 ; 102.591,221.996 104.851,221.996 ; 102.591,222.021 104.826,222.021 ; 102.616,107.366 102.921,107.366 ; 102.616,222.047 104.826,222.047 ; 102.616,222.072 104.826,222.072 ; 102.641,222.098 104.8,222.098 ; 102.641,222.123 104.8,222.123 ; 102.641,222.148 104.8,222.148 ; 102.641,222.174 104.775,222.174 ; 102.667,222.199 104.775,222.199 ; 102.667,222.225 104.775,222.225 ; 102.692,107.391 102.768,107.391 ; 102.692,107.544 102.768,107.544 ; 102.692,107.569 102.794,107.569 ; 102.692,219.989 103.276,219.989 ; 102.692,220.142 102.743,220.142 ; 102.692,220.167 102.768,220.167 ; 102.692,220.193 102.819,220.193 ; 102.692,222.25 104.75,222.25 ; 102.692,222.275 104.75,222.275 ; 102.692,222.301 104.724,222.301 ; 102.718,107.518 102.743,107.518 ; 102.718,222.326 104.724,222.326 ; 102.718,222.352 104.724,222.352 ; 102.718,222.377 104.724,222.377 ; 102.743,222.402 104.699,222.402 ; 102.743,222.428 104.699,222.428 ; 102.768,220.015 102.921,220.015 ; 102.768,222.453 104.699,222.453 ; 102.768,222.479 104.673,222.479 ; 102.768,222.504 104.673,222.504 ; 102.794,222.529 104.648,222.529 ; 102.794,222.555 104.648,222.555 ; 102.794,222.58 104.648,222.58 ; 102.819,107.391 102.921,107.391 ; 102.819,222.606 104.623,222.606 ; 102.819,222.631 104.623,222.631 ; 102.845,107.417 102.921,107.417 ; 102.845,107.569 103.099,107.569 ; 102.845,222.656 104.597,222.656 ; 102.845,222.682 104.597,222.682 ; 102.845,222.707 104.597,222.707 ; 102.845,222.733 104.572,222.733 ; 102.87,220.04 102.921,220.04 ; 102.87,220.167 102.972,220.167 ; 102.87,220.193 102.997,220.193 ; 102.87,222.758 104.572,222.758 ; 102.87,222.783 104.572,222.783 ; 102.87,222.809 104.572,222.809 ; 102.921,107.544 103.073,107.544 ; 102.946,107.315 103.454,107.315 ; 102.946,107.34 103.454,107.34 ; 102.946,107.366 103.124,107.366 ; 102.997,220.015 103.302,220.015 ; 103.073,220.04 103.149,220.04 ; 103.073,220.193 103.149,220.193 ; 103.073,220.218 103.175,220.218 ; 103.099,220.167 103.124,220.167 ; 103.149,107.569 103.226,107.569 ; 103.2,220.04 103.302,220.04 ; 103.226,220.066 103.302,220.066 ; 103.226,220.218 103.48,220.218 ; 103.251,107.366 103.302,107.366 ; 103.276,107.391 103.302,107.391 ; 103.276,107.544 103.403,107.544 ; 103.276,107.569 103.403,107.569 ; 103.302,107.518 103.378,107.518 ; 103.302,220.193 103.454,220.193 ; 103.327,219.964 103.835,219.964 ; 103.327,219.989 103.835,219.989 ; 103.327,220.015 103.505,220.015 ; 103.378,107.366 103.454,107.366 ; 103.403,107.391 103.48,107.391 ; 103.429,107.417 103.454,107.417 ; 103.48,107.29 105.207,107.29 ; 103.48,107.315 105.181,107.315 ; 103.505,107.34 104.724,107.34 ; 103.505,107.594 105.08,107.594 ; 103.53,107.366 104.089,107.366 ; 103.53,107.569 104.013,107.569 ; 103.53,220.218 103.607,220.218 ; 103.556,107.544 104.013,107.544 ; 103.581,107.518 103.632,107.518 ; 103.607,107.391 103.734,107.391 ; 103.632,220.015 103.683,220.015 ; 103.657,220.04 103.683,220.04 ; 103.657,220.193 103.784,220.193 ; 103.657,220.218 103.784,220.218 ; 103.683,107.417 103.708,107.417 ; 103.683,107.518 103.886,107.518 ; 103.683,220.167 103.759,220.167 ; 103.708,107.493 103.784,107.493 ; 103.759,220.015 103.835,220.015 ; 103.784,220.04 103.861,220.04 ; 103.81,220.066 103.835,220.066 ; 103.835,107.391 103.962,107.391 ; 103.861,219.939 105.588,219.939 ; 103.861,219.964 105.562,219.964 ; 103.886,219.989 105.105,219.989 ; 103.886,220.243 105.461,220.243 ; 103.911,220.015 104.47,220.015 ; 103.911,220.218 104.394,220.218 ; 103.937,107.518 103.988,107.518 ; 103.937,220.193 104.394,220.193 ; 103.962,220.167 104.013,220.167 ; 103.988,220.04 104.115,220.04 ; 104.013,107.391 104.089,107.391 ; 104.013,107.417 104.064,107.417 ; 104.038,107.569 104.165,107.569 ; 104.064,107.544 104.165,107.544 ; 104.064,220.066 104.089,220.066 ; 104.064,220.167 104.267,220.167 ; 104.089,220.142 104.165,220.142 ; 104.115,107.518 104.14,107.518 ; 104.14,105.791 105.74,105.791 ; 104.14,105.816 105.74,105.816 ; 104.14,105.842 105.715,105.842 ; 104.14,107.366 104.699,107.366 ; 104.165,105.715 105.766,105.715 ; 104.165,105.74 105.766,105.74 ; 104.165,105.766 105.74,105.766 ; 104.165,107.391 104.216,107.391 ; 104.191,105.613 105.816,105.613 ; 104.191,105.639 105.791,105.639 ; 104.191,105.664 105.791,105.664 ; 104.191,105.689 105.766,105.689 ; 104.191,107.569 105.105,107.569 ; 104.216,105.537 105.842,105.537 ; 104.216,105.562 105.816,105.562 ; 104.216,105.588 105.816,105.588 ; 104.216,220.04 104.343,220.04 ; 104.242,105.435 105.867,105.435 ; 104.242,105.461 105.867,105.461 ; 104.242,105.486 105.842,105.486 ; 104.242,105.512 105.842,105.512 ; 104.242,107.544 105.105,107.544 ; 104.267,105.359 105.893,105.359 ; 104.267,105.385 105.893,105.385 ; 104.267,105.41 105.867,105.41 ; 104.292,105.334 105.893,105.334 ; 104.292,107.391 104.343,107.391 ; 104.292,107.518 104.775,107.518 ; 104.318,220.167 104.369,220.167 ; 104.394,220.04 104.47,220.04 ; 104.394,220.066 104.445,220.066 ; 104.419,220.218 104.546,220.218 ; 104.445,220.193 104.546,220.193 ; 104.47,107.391 104.673,107.391 ; 104.496,107.417 104.546,107.417 ; 104.496,220.167 104.521,220.167 ; 104.521,218.44 106.121,218.44 ; 104.521,218.465 106.121,218.465 ; 104.521,218.491 106.096,218.491 ; 104.521,220.015 105.08,220.015 ; 104.546,218.364 106.147,218.364 ; 104.546,218.389 106.147,218.389 ; 104.546,218.415 106.121,218.415 ; 104.546,220.04 104.597,220.04 ; 104.572,218.262 106.197,218.262 ; 104.572,218.288 106.172,218.288 ; 104.572,218.313 106.172,218.313 ; 104.572,218.338 106.147,218.338 ; 104.572,220.218 105.486,220.218 ; 104.597,218.186 106.223,218.186 ; 104.597,218.211 106.197,218.211 ; 104.597,218.237 106.197,218.237 ; 104.623,218.084 106.248,218.084 ; 104.623,218.11 106.248,218.11 ; 104.623,218.135 106.223,218.135 ; 104.623,218.161 106.223,218.161 ; 104.623,220.193 105.486,220.193 ; 104.648,218.008 106.274,218.008 ; 104.648,218.034 106.274,218.034 ; 104.648,218.059 106.248,218.059 ; 104.673,217.983 106.274,217.983 ; 104.673,220.04 104.724,220.04 ; 104.673,220.167 105.156,220.167 ; 104.851,107.34 105.181,107.34 ; 104.851,107.366 105.181,107.366 ; 104.851,220.04 105.054,220.04 ; 104.877,107.391 105.131,107.391 ; 104.877,220.066 104.927,220.066 ; 104.902,107.417 104.953,107.417 ; 105.029,107.518 105.08,107.518 ; 105.232,219.989 105.562,219.989 ; 105.232,220.015 105.562,220.015 ; 105.258,220.04 105.512,220.04 ; 105.283,220.066 105.334,220.066